# Altium PCB LCD_Board.PcbDoc
Units mil, origin at the board's own origin, x right, y up, seen from the top; angles counter-clockwise.
Board outline 6000 x 4000 mil, 2 copper layers (Top Layer, Bottom Layer); 2 components, 16 nets, 32 pads, 0 vias.
Unrouted connection lines stored in the file: 16.
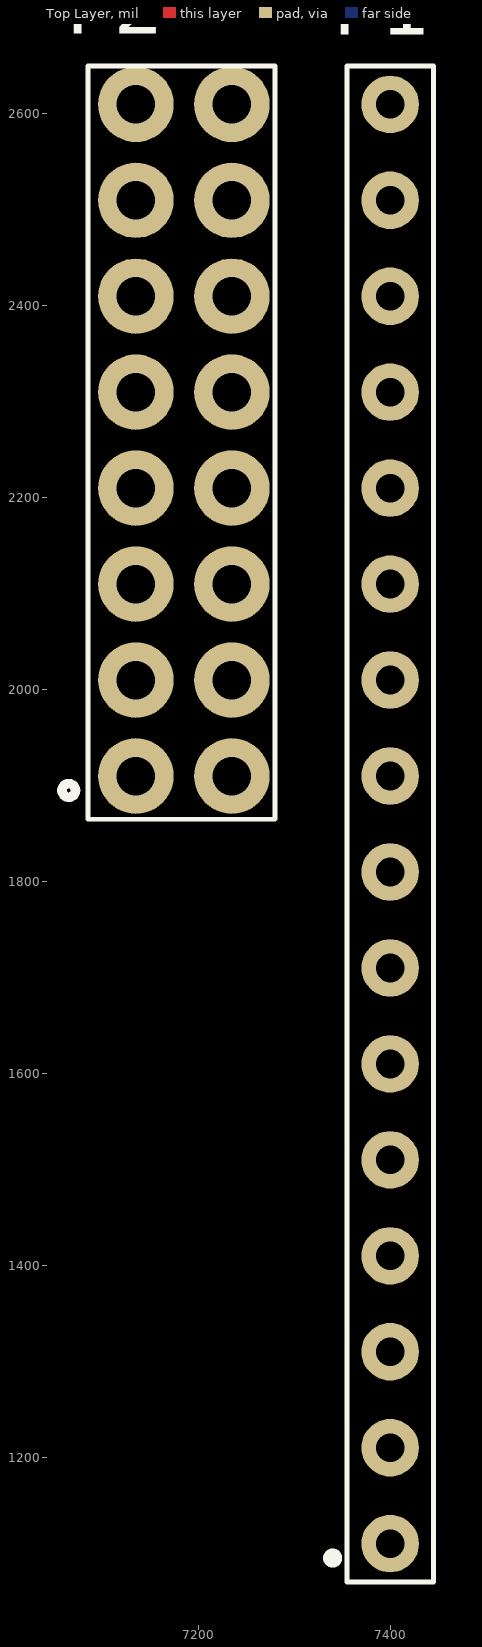
[diagram p0: Top Layer view]
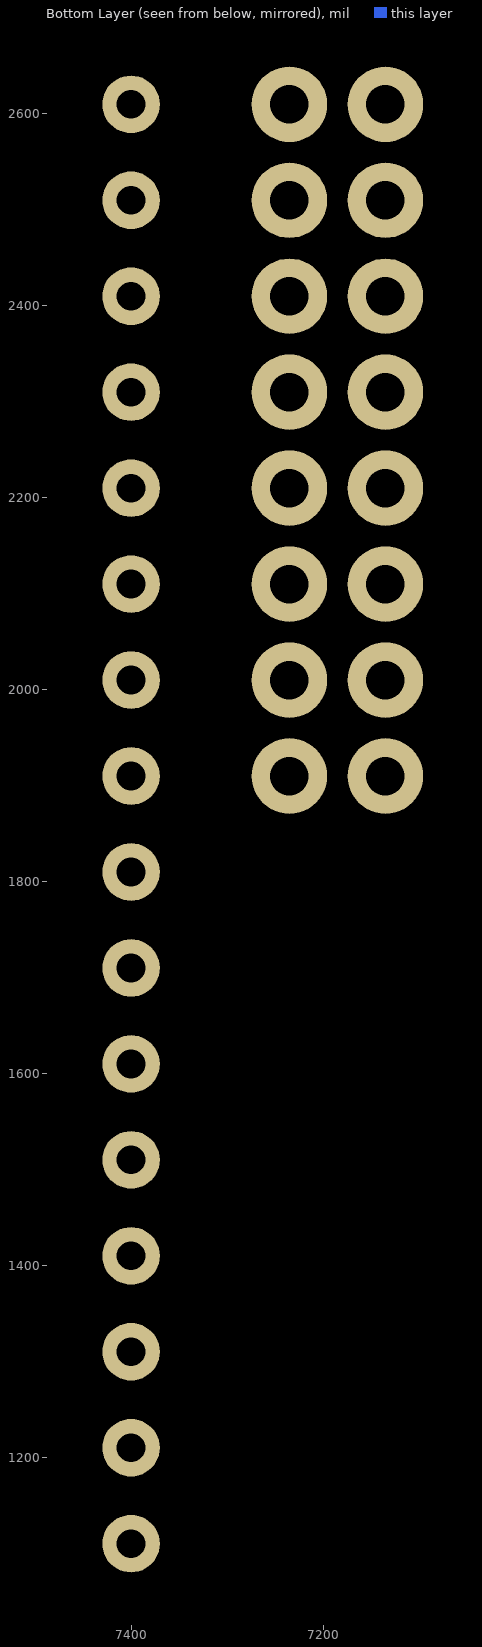
[diagram p1: Bottom Layer view, seen from below]

## Layer stack, top to bottom
Top Solder: solder mask 0.4, Solder Resist, Dk 3.5
Top Layer: signal copper 1.4
Dielectric 1: dielectric 12.6, FR-4, Dk 4.8
Bottom Layer: signal copper 1.4
Bottom Solder: solder mask 0.4, Solder Resist, Dk 3.5

## Board outline
1000,1000 7000,1000 7000,5000 1000,5000

## Design rules (kind name [scope] priority, off if disabled: settings)
Clearance [All] p1: gap=10 ignorepadtopadclearanceinfootprint=FALSE except(0: Arc-Hole Track-Hole SMDPad-Hole THPad-Hole Via-Hole Fill-Hole Poly-Hole Region-Hole Text-Hole)
PolygonConnect [All] p1: connectstyle=Relief reliefconductorwidth=10 reliefentries=4 polygonreliefangle="90 Angle" airgapwidth=10
RoutingVias [All] p1: holewidth=28 width=50 viastyle="Through Hole" minholewidth=28 minwidth=50 maxholewidth=28 maxwidth=50
SolderMaskExpansion [All] p1: expansion=4 istentingtop=FALSE
Width [All] p1: maxlimit=10 minlimit=10 preferedwidth=10
30 further rules are at their usual default settings.

## Components (designator, comment, footprint, x,y, rotation, side; value= is the part's Value field where it differs from the comment)
P1 "X6511WV-16H-C30D60" X6511WV-16H-C30D60 7400,1860 r90 top
P2 "B-2100S08P-B110" B-2100S08P-B110 7185,2260 r90 top

## Footprints (in the part's own frame and the unit in brackets; to place one, negate y for a bottom-side part, rotate by r counter-clockwise, add the part's x,y. Pads: shape width x height; smd on the part's side, far side on the other; paste and mask are expansions set on the pad)
B-2100S08P-B110 [mm] "Straight 2.54mm 6mm -40?~+105? 2 3mm 8 2.54mm Black Brass 2x4P 2.54mm Plugin,P=2.54mm Pin Headers"
  round 2 hole 1.02: 1(-8.89,1.27) 2(-8.89,-1.27) 3(-6.35,1.27) 4(-6.35,-1.27) 5(-3.81,1.27) 6(-3.81,-1.27) 7(-1.27,1.27) 8(-1.27,-1.27) 9(1.27,1.27) 10(1.27,-1.27) 11(3.81,1.27) 12(3.81,-1.27) 13(6.35,1.27) 14(6.35,-1.27) 15(8.89,1.27) 16(8.89,-1.27)
  silkscreen extent -10.03,-2.41 9.91,3.23, body extent -9.96,-2.44 9.96,2.44, height 7.84
X6511WV-16H-C30D60 [mil] "250V 3A Straight Square Pins 2.5mm 6mm -40?~+105? 1 16 3mm 2.54mm Black 1x16P Plugin,P=2.54mm Pin Headers ROHS"
  round 60 hole 30: 1(-750,0) 2(-650,0) 3(-550,0) 4(-450,0) 5(-350,0) 6(-250,0) 7(-150,0) 8(-50,0) 9(50,0) 10(150,0) 11(250,0) 12(350,0) 13(450,0) 14(550,0) 15(650,0) 16(750,0)
  silkscreen extent -790,-45 790,65, body extent -792,-46 792,46, height 416

## Part data
P1: Current Rating (Max)=3A, Manufacturer="XKB Connectivity", Mounting Type=Straight, Pitch=2.54mm
P2: "Straight 2.54mm 6mm -40℃~+105℃ 2 3mm 8 2.54mm Black Brass 2x4P 2.54mm Plugin,P=2.54mm Pin Headers", Manufacturer="Ckmtw(Shenzhen Cankemeng)", Operating Temperature Range=-40℃~+105℃, Insulation Height=2.54mm, Length of End Connection Pin=3mm, Length of Mating Pin=6mm, Mounting Type=Straight, Number of Rows=2

## Nets (pads, with @x,y where several pads share a name; then routed paths per layer and width w, separated by ;. In a path a pad name is that pad's centre, name@x,y a point inside that pad or via, vN(x,y) a via of type N, cw(c..) or ccw(c..) an arc to the next point about the centre after c; other vN are vias at no path point)
PIN1: P1.1 P2.1
PIN2: P1.2 P2.2
PIN3: P1.3 P2.3
PIN4: P1.4 P2.4
PIN5: P1.5 P2.5
PIN6: P1.6 P2.6
PIN7: P1.7 P2.7
PIN8: P1.8 P2.8
PIN9: P1.9 P2.9
PIN10: P1.10 P2.10
PIN11: P1.11 P2.11
PIN12: P1.12 P2.12
PIN13: P1.13 P2.13
PIN14: P1.14 P2.14
PIN15: P1.15 P2.15
PIN16: P1.16 P2.16